# Altium PCB PCB-Thermostat.PcbDoc (part 5 of 5)
Units mm, origin at the board's own origin, x right, y up, seen from the top; angles counter-clockwise.
Board outline 100 x 90 mm, 4 copper layers (Top, PWR, GND, Bottom), stack 1.585 mm thick; 187 components, 164 nets, 696 pads, 417 vias.
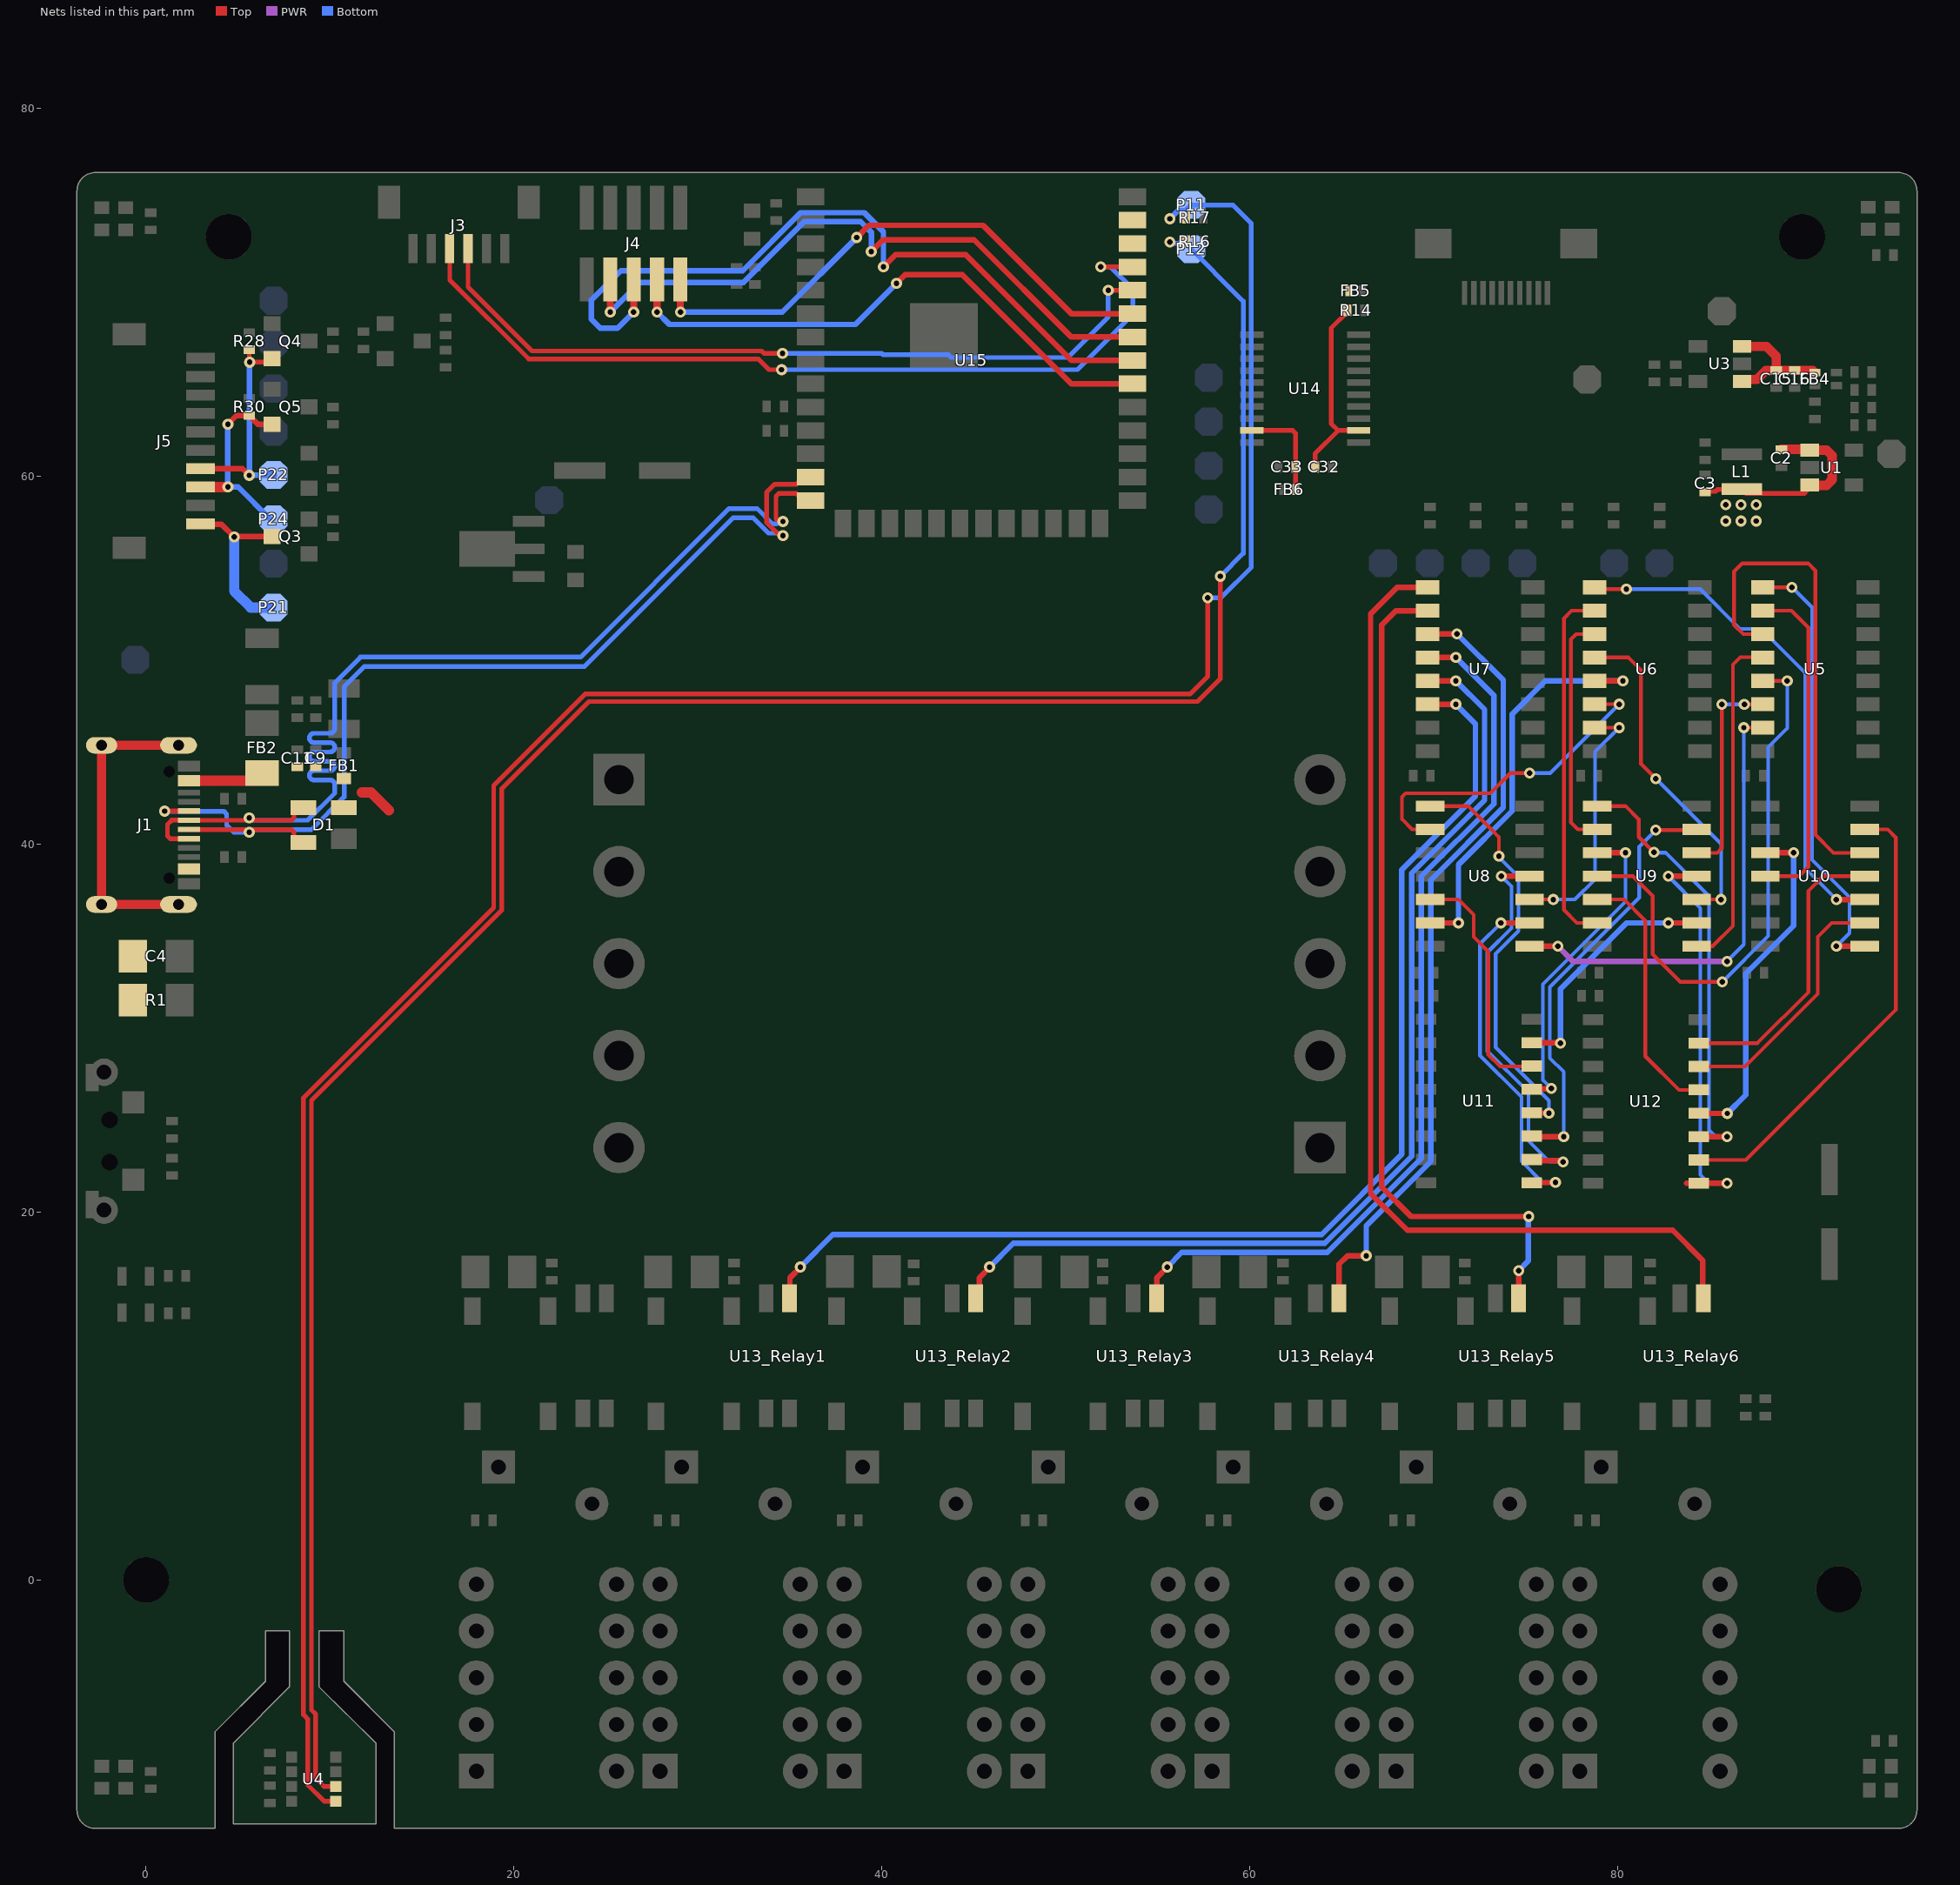
[diagram p5: the nets of this part, all layers, seen from the top]

## Via types
v1: diameter 0.6, hole 0.3, Top to Bottom, 391 vias
v2: diameter 0.8, hole 0.4, Top to Bottom, 26 vias

## Nets (pads, with @x,y where several pads share a name; then routed paths per layer and width w, separated by ;. In a path a pad name is that pad's centre, name@x,y a point inside that pad or via, vN(x,y) a via of type N, cw(c..) or ccw(c..) an arc to the next point about the centre after c; other vN are vias at no path point) (continued)
RELAY_STSN_Relay1: U7.14 U13_Relay1.3 | length 65.8
  Top w0.3: U13_Relay1.3@35,14.772 35,16.429 35.574,17.003 v1@35.584,17.014 ; U7.14@69.657,47.602 U7.14@69.654,47.604 v1(71.189,47.604)
  Bottom w0.3: v1(35.563,17.014) 37.329,18.78 63.895,18.78 68.254,23.139 68.254,38.602 72.254,42.602 72.254,46.539 v1(71.189,47.604)
RELAY_STSN_Relay2: U7.13 U13_Relay2.3 | length 57.6
  Top w0.3: U13_Relay2.3@45.287,14.772 45.287,16.429 45.861,17.003 v1@45.871,17.014 ; U7.13@69.695,48.834 U7.13@69.654,48.874 v1(71.189,48.874)
  Bottom w0.3: v1(45.85,17.014) 47.138,18.302 64.057,18.302 68.783,23.028 68.783,38.425 72.754,42.395 72.754,47.309 v1(71.189,48.874)
RELAY_STSN_Relay3: U7.12 U13_Relay3.3 | length 50
  Top w0.3: U13_Relay3.3@54.939,14.772 54.939,16.429 55.513,17.003 v1@55.523,17.014 ; U7.12@69.654,50.144 v1(71.189,50.144)
  Bottom w0.3: v1(55.502,17.014) 56.294,17.805 64.2,17.805 69.317,22.922 69.317,38.252 73.253,42.189 73.253,48.08 v1(71.189,50.144)
RELAY_STSN_Relay4: U7.11 U13_Relay4.3 | length 43.6
  Top w0.3: U13_Relay4.3@64.845,14.772 64.845,17.169 65.303,17.628 v1(66.319,17.628) ; U7.11@69.654,51.414 U7.11@69.719,51.479 ; U7.11@69.719,51.428 v1(71.254,51.428)
  Bottom w0.3: v1(66.319,17.628) 66.319,19.253 69.825,22.758 69.825,38.053 73.766,41.995 73.766,48.916 v1(71.254,51.428)
RELAY_STSN_Relay5: U7.10 U13_Relay5.3 | length 46.7
  Top w0.3: U7.10@69.654,52.684 67.929,52.684 67.158,51.912 67.158,21.356 68.754,19.759 v1@75.133,19.759 ; U13_Relay5.3@74.603,15.318 v1(74.603,16.818)
  Bottom w0.3: v1(74.603,16.818) 75.133,17.348 v1@75.133,19.757
  other v1: 75.149,19.759
RELAY_STSN_Relay6: U7.9 U13_Relay6.3 | length 56.8
  Top w0.3: U7.9@69.654,53.954 67.999,53.954 66.554,52.509 66.554,21.009 68.554,19.009 82.972,19.009 84.607,17.374 U13_Relay6.3@84.607,15.318
RLY_R0: U8.2 U11.1 | length 19.6
  Top w0.3: v1(73.641,35.719) U8.2@75.194,35.719 ; U11.1@75.319,21.564 75.358,21.602 76.593,21.602 v1(76.606,21.615)
  Bottom w0.2: v1(73.641,35.719) 72.504,34.582 72.504,28.511 74.754,26.261 74.754,22.759 75.906,21.607 76.598,21.607 v1(76.606,21.615)
RLY_R1: U9.6 U11.3 | length 22.8
  Top w0.2: v1(82.054,40.759) 83.689,40.759 U9.6@83.729,40.799
  Top w0.3: U11.3@75.319,24.104 v1(77.049,24.104)
  Bottom w0.2: v1(77.049,24.104) 77.049,27.624 76.302,28.372 76.302,32.232 81.155,37.085 81.155,39.86 v1(82.054,40.759)
RLY_R2: U9.10 U11.5 | length 18.7
  Top w0.2: U9.10@78.779,39.529 79.984,39.529
  Top w0.3: U11.5@75.32,26.644 75.371,26.695 76.352,26.695 v1(76.378,26.721) ; U9.10@78.871,39.529 v1(80.406,39.529)
  Bottom w0.2: v1(76.378,26.721) 75.924,27.175 75.924,32.388 80.406,36.871 v1(80.406,39.529)
RLY_R3: U9.2 U11.7 | length 14.3
  Top w0.2: v1@82.814,35.719 U9.2@83.729,35.719
  Top w0.3: U11.7@75.32,29.184 75.332,29.197 76.867,29.197 v1(76.879,29.184) ; v1(82.736,35.719) 82.814,35.719 U9.2@84.271,35.719
  Bottom w0.3: v1(76.879,29.184) 76.879,32.125 80.474,35.719 v1(82.736,35.719)
RLY_R4: U10.6 U12.2 | length 26
  Top w0.2: U12.2@84.396,22.834 86.943,22.834 95.098,30.988 95.098,40.361 94.659,40.799 U10.6@92.729,40.799
RLY_R5: U10.10 U12.4 | length 19
  Top w0.2: U10.10@87.779,39.529 U10.10@88.006,39.529 U10.10@88.624,39.529
  Top w0.3: U12.4@84.396,25.374 84.409,25.362 v1(85.944,25.362) ; U10.10@88.624,39.529 v1(89.541,39.529)
  Bottom w0.3: v1(85.944,25.362) 86.944,26.362 86.944,32.969 89.541,35.566 v1(89.541,39.529)
RLY_R6: U10.2 U12.6 | length 13.4
  Top w0.2: U12.6@84.396,27.914 86.909,27.914 90.854,31.859 90.854,34.959 91.614,35.719 U10.2@92.729,35.719
RLY_S0: U8.4 U11.2 | length 21.7
  Top w0.3: v1(73.659,38.259) U8.4@75.194,38.259 ; U11.2@75.319,22.834 75.363,22.79 76.955,22.79 v1(77.013,22.733)
  Bottom w0.2: v1(73.659,38.259) 74.219,37.699 74.219,35.433 72.904,34.118 72.904,28.747 75.132,26.519 75.132,23.881 76.254,22.759 76.28,22.733 v1(77.013,22.733)
RLY_S1: U8.8 U11.4 | length 22.6
  Top w0.2: U8.8@69.779,42.069 U8.8@69.794,42.069 71.844,42.069 73.01,40.903 73.533,40.38 v1(73.533,39.345)
  Top w0.3: U11.4@75.32,25.375 75.333,25.387 76.238,25.387 v1(76.251,25.375)
  Bottom w0.2: v1(73.533,39.345) 73.533,39.294 74.6,38.227 74.6,35.28 73.354,34.034 73.354,28.957 76.251,26.06 v1(76.251,25.375)
RLY_S2: U8.12 U11.6 | length 12.7
  Top w0.2: U8.12@69.779,36.989 71.324,36.989 72.154,36.159 72.154,34.959 72.954,34.159 72.954,28.559 73.599,27.914 U11.6@74.779,27.914
RLY_S3: U9.4 U12.1 | length 23.9
  Top w0.3: v1(82.736,38.259) U9.4@84.271,38.259 ; 83.729,21.564 v1(85.931,21.564) U12.1@84.396,21.564
  Bottom w0.2: v1(82.736,38.259) 84.482,36.513 84.482,22.031 84.949,21.564 v1(85.931,21.564)
RLY_S4: U9.8 U12.3 | length 24
  Top w0.2: U9.8@78.871,42.069 80.41,42.069 81.128,41.351 81.128,40.386 v1(81.954,39.559)
  Top w0.3: U12.3@84.396,24.104 v1(85.931,24.104)
  Bottom w0.2: v1(81.954,39.559) 81.975,39.538 82.585,39.538 84.954,37.169 84.954,24.459 85.309,24.104 v1(85.931,24.104)
RLY_S5: U9.12 U12.5 | length 14.1
  Top w0.2: U9.12@78.871,36.989 80.334,36.989 81.483,35.839 81.483,28.473 83.313,26.644 U12.5@84.396,26.644
RLY_S6: U10.4 U12.7 | length 15.3
  Top w0.2: U12.7@84.396,29.184 87.579,29.184 90.354,31.959 90.354,37.459 91.154,38.259 U10.4@92.729,38.259
RLYRSTN0: U5.15 U8.1 | length 25
  Top w0.2: v1@86.741,46.33 v1(86.843,46.33) U5.15@87.609,46.33
  Top w0.3: U8.1@75.194,34.449 v1(76.729,34.449)
  PWR w0.3: v1(76.729,34.449) 77.549,33.63 v1(85.928,33.63)
  Bottom w0.2: v1(85.928,33.63) 86.843,34.544 v1(86.843,46.33)
RLYRSTN1: U5.14 U9.5 | length 12
  Top w0.2: U9.5@83.729,39.529 U9.5@84.271,39.529 84.724,39.529 85.401,39.529 85.649,39.776 v1(85.649,47.6) ; v1@86.766,47.6 v1(86.868,47.6) U5.14@87.669,47.6
  Bottom w0.2: v1(85.649,47.6) v1(86.868,47.6)
RLYRSTN2: U5.13 U9.11 | length 30.2
  Top w0.2: U9.11@78.871,38.259 80.816,38.259 81.89,37.186 81.89,34.011 83.388,32.512 v1(85.674,32.512) ; U5.13@87.866,48.874 v1(89.199,48.874)
  Bottom w0.2: v1(85.674,32.512) 88.163,35.001 88.163,45.263 89.199,46.299 v1(89.199,48.874)
RLYRSTN3: U5.12 U9.1 | length 18.9
  Top w0.2: U9.1@83.729,34.449 85.144,34.449 86.254,35.559 86.254,49.759 86.654,50.159 87.739,50.159 U5.12@87.754,50.144
RLYRSTN4: U5.11 U10.5 | length 26.1
  Top w0.2: U5.11@87.754,51.414 86.813,51.414 86.309,51.918 86.309,54.814 86.754,55.259 90.334,55.259 90.726,54.867 90.726,40.516 91.713,39.529 U10.5@92.729,39.529
RLYRSTN5: U5.10 U10.11 | length 18.8
  Top w0.2: U5.10@87.754,52.684 89.429,52.684 90.348,51.765 90.348,38.76 89.846,38.259 U10.11@88.006,38.259 U10.11@87.779,38.259
RLYRSTN6: U5.9 U10.1 | length 24.4
  Top w0.2: U5.9@87.754,53.954 U5.9@87.866,53.954 89.449,53.954 v1(89.454,53.959) ; 92.406,34.467 92.424,34.449
  Top w0.3: v1(91.871,34.449) 92.424,34.449 U10.1@93.406,34.449
  Bottom w0.2: v1(89.454,53.959) 90.548,52.865 90.548,39.145 92.583,37.109 92.583,35.161 v1(91.871,34.449)
RLYSETN0: U6.15 U8.3 | length 14.1
  Top w0.2: U8.3@75.194,36.989 v1(76.486,36.989) ; U6.15@78.731,46.334 v1(80.064,46.334)
  Bottom w0.2: v1(76.486,36.989) 77.654,36.989 78.754,38.089 78.754,45.024 v1(80.064,46.334)
RLYSETN1: U6.14 U8.9 | length 18.3
  Top w0.2: U8.9@69.779,40.799 68.814,40.799 68.254,41.359 68.254,42.559 68.454,42.759 73.054,42.759 74.154,43.859 v1(75.191,43.859) ; U6.14@78.731,47.604 U6.14@78.754,47.604 ; U6.14@78.799,47.559 U6.14@78.754,47.604 ; v1(80.064,47.604) U6.14@78.754,47.604
  Bottom w0.2: v1(75.191,43.859) 76.319,43.859 v1(80.064,47.604)
RLYSETN2: U6.13 U8.13 | length 22.4
  Top w0.2: U8.13@69.779,35.719 U8.13@69.794,35.719
  Top w0.3: U8.13@69.794,35.719 v1(71.329,35.719) ; U6.13@78.731,48.874 v1(80.266,48.874)
  Bottom w0.3: v1(71.329,35.719) 71.329,38.882 74.244,41.797 74.244,47.066 76.052,48.874 v1(80.266,48.874)
RLYSETN3: U6.12 U9.3 | length 19.6
  Top w0.2: U6.12@78.754,50.144 80.569,50.144 81.254,49.459 81.254,44.359 v1(82.054,43.559) ; U9.3@83.729,36.989 U9.3@84.746,36.989 ; U9.3@84.271,36.989 U9.3@84.746,36.989 ; v1(85.604,36.989) U9.3@84.746,36.989
  Bottom w0.2: v1@81.894,43.719 85.604,40.009 v1(85.604,36.989)
RLYSETN4: U6.11 U9.9 | length 12.9
  Top w0.2: U6.11@78.731,51.414 77.728,51.414 77.441,51.127 77.441,41.177 77.819,40.799 U9.9@78.779,40.799
RLYSETN5: U6.10 U9.13 | length 19.7
  Top w0.2: U6.10@78.754,52.684 77.479,52.684 77.064,52.268 77.064,36.424 77.768,35.719 U9.13@78.779,35.719
RLYSETN6: U6.9 U10.3 | length 27.9
  Top w0.2: U6.9@78.754,53.954 78.849,53.859 v1(80.454,53.859)
  Top w0.3: v1(91.871,36.989) U10.3@93.406,36.989
  Bottom w0.2: v1(80.454,53.859) 84.47,53.859 86.634,51.694 87.777,51.694 90.17,49.301 90.17,38.69 v1(91.871,36.989)
RSTKEY: J5.10 P21.1 Q3.3 | length 9.5
  Top w0.305: J5.10@2.982,57.388 4.1,57.388 v1(4.796,56.693) ; v1@4.832,56.718 Q3.3@6.865,56.718
  Top w0.559: J5.10@2.961,57.409 J5.10@2.982,57.388 ; v1(4.796,56.693) 4.807,56.693 v1@4.832,56.718
  Bottom w0.559: v1@4.796,56.674 4.796,53.751 5.69,52.857 P21.1@6.782,52.857
RX_1V8: J5.7 P22.1 Q4.2 R28.1 | length 12.2
  Top w0.254: R28.1@5.613,66.876 5.613,66.192 6.661,66.192 Q4.2@6.865,66.396
  Top w0.305: J5.7@2.965,60.405 5.243,60.405 v1@5.602,60.046
  Top w0.559: J5.7@2.961,60.409 J5.7@2.965,60.405 ; v1@5.602,60.046 v1(5.613,60.046)
  Bottom w0.305: v1(5.613,60.046) 5.624,60.056 5.624,66.182 v1(5.634,66.192) ; v1@5.621,60.053 P22.1@6.84,60.053
  Bottom w0.559: v1(5.613,60.046) v1@5.621,60.053 ; P22.1@6.84,60.053 P22.1@6.858,60.071
RXD: J3.4 U15.36 | length 42
  Top w0.254: J3.4@17.505,72.191 17.505,70.277 20.979,66.802 33.454,66.802 33.581,66.675 v1(34.595,66.675) ; v1(52.299,70.104) U15.36@53.619,70.104
  Bottom w0.254: v1(34.595,66.675) 39.979,66.675 40.055,66.599 43.608,66.599 43.756,66.451 50.094,66.451 52.299,68.656 v1(52.299,70.104)
SCL: P11.1 R17.1 U4.4 U15.39 | length 133
  Top w0.254: U4.4@10.319,-12.02 9.684,-12.02 8.788,-11.125 8.788,-7.544 8.56,-7.315 8.56,26.216 18.898,36.554 18.898,43.189 23.867,48.158 56.744,48.158 57.709,49.124 v1(57.709,53.391)
  Bottom w0.254: P11.1@56.807,74.741 59.066,74.741 60.071,73.736 60.071,55.042 58.42,53.391 v1(57.709,53.391)
  Bottom w0.305: v1(55.651,73.99) 56.084,74.423 56.489,74.423 P11.1@56.807,74.741
SDA: P12.1 R16.1 U4.3 U15.38 | length 127.4
  Top w0.254: U4.3@10.319,-11.22 9.671,-11.22 9.22,-10.77 9.22,-7.29 8.992,-7.061 8.992,26.073 19.329,36.411 19.329,43.002 24.079,47.752 57.15,47.752 58.395,48.997 v1(58.395,54.559)
  Bottom w0.254: v1@55.626,72.72 55.689,72.657 56.49,72.657 59.639,69.507 59.639,55.804 v1(58.395,54.559)
  other v1: 55.651,72.72
SH: C4.1 J1.S1 J1.S2 J1.S3 J1.S4 R1.2 | length 17
  Top w0.5: J1.S1@1.77,36.721 J1.S2@-2.41,36.721 J1.S3@-2.41,45.371 J1.S4@1.77,45.371
TCK: J4.4 U15.32 | length 31.5
  Top w0.305: v1(40.792,70.485) 41.25,70.942 44.374,70.942 50.292,65.024 U15.32@53.619,65.024
  Top w0.381: v1(27.776,68.922) J4.4@27.776,70.694
  Bottom w0.305: v1(27.776,68.922) 28.453,68.245 38.552,68.245 v1(40.792,70.485)
TDI: J4.8 U15.34 | length 36
  Top w0.305: v1(39.421,72.212) 39.425,72.212 40.06,72.847 45.009,72.847 50.292,67.564 U15.34@53.619,67.564
  Top w0.381: v1(25.236,68.922) J4.8@25.236,70.694 ; U15.34@53.594,67.64 U15.34@53.619,67.666
  Bottom w0.305: v1(25.236,68.922) 26.85,70.536 32.474,70.536 35.776,73.838 38.839,73.838 39.421,73.256 v1(39.421,72.212)
TDO: J4.6 U15.33 | length 42
  Top w0.305: v1(40.081,71.374) 40.742,72.034 44.552,72.034 50.292,66.294 U15.33@53.619,66.294
  Top w0.381: v1(26.506,68.922) J4.6@26.506,70.694
  Bottom w0.305: v1(26.506,68.922) 25.631,68.047 24.689,68.047 24.206,68.529 24.206,69.571 25.806,71.171 32.426,71.171 35.576,74.32 39.04,74.32 40.081,73.279 v1(40.081,71.374)
TMS: J4.2 U15.35 | length 30.3
  Top w0.305: v1(38.633,72.974) 39.294,73.635 45.491,73.635 50.292,68.834 U15.35@53.619,68.834
  Top w0.381: v1(29.046,68.922) J4.2@29.046,70.694 ; U15.35@53.619,68.936 U15.35@53.645,68.91
  Bottom w0.305: v1(29.046,68.922) 34.581,68.922 v1(38.633,72.974)
TX_1V8: J5.8 P24.1 Q5.2 R30.1 | length 10.6
  Top w0.305: v1(4.451,62.819) 4.921,63.289 5.702,63.289 5.779,63.213 5.779,63.124 6.083,62.819 Q5.2@6.865,62.819
  Top w0.559: J5.8@2.961,59.409 2.962,59.41 4.292,59.41 v1@4.293,59.411
  Bottom w0.305: v1(4.451,62.819) v1(4.451,59.411) 5.004,59.411 P24.1@6.756,57.658
TXD: J3.3 U15.37 | length 47.3
  Top w0.254: J3.3@16.512,72.191 16.512,70.659 20.8,66.37 33.275,66.37 33.859,65.786 v1(34.544,65.786) ; v1(51.892,71.374) U15.37@53.619,71.374
  Bottom w0.254: v1(34.544,65.786) 50.622,65.786 53.645,68.809 53.645,70.155 52.426,71.374 v1(51.892,71.374)
USB_N: D1.4 J1.A7 J1.B7 U15.13 | length 58.2
  Top w0.254: v1@1.015,41.808 2.328,41.808 J1.B7@2.34,41.796 ; J1.A7@2.348,40.788 v1@5.385,40.788 ; v1@5.842,40.788 7.9,40.788 8.051,40.637 8.051,40.359 8.324,40.086 D1.4@8.56,40.086 ; v1@34.381,56.827 33.731,57.477 33.731,59.117 34.178,59.563 35.348,59.563 35.406,59.621 35.796,59.621 U15.13@36.119,59.944
  Bottom w0.254: v1@1.015,41.783 4.235,41.783 4.384,41.634 4.384,41.031 4.762,40.653 v1(5.613,40.653) 5.707,40.653 5.842,40.788 8.994,40.788 10.77,42.563 10.77,47.581 10.77,48.558 11.869,49.657 23.832,49.657 31.906,57.731 33.003,57.731 33.837,56.896 34.391,56.896 34.526,56.761 v1(34.62,56.761)
  other v1: 1.015,41.794
USB_P: D1.3 J1.A6 J1.B6 U15.14 | length 59.7
  Top w0.254: J1.B6@2.34,40.296 1.317,40.296 1.168,40.445 1.168,41.072 1.396,41.3 J1.A6@2.34,41.3 ; J1.A6@2.34,41.296 v1@5.385,41.296 ; v1@5.842,41.296 7.896,41.296 8.045,41.445 8.045,41.713 8.318,41.986 D1.3@8.56,41.986 ; 34.322,57.605 34.239,57.688 34.239,58.906 34.388,59.055 35.348,59.055 35.406,58.997 35.796,58.997 U15.14@36.119,58.674
  Bottom w0.254: v1(5.613,41.431) 5.707,41.431 5.842,41.296 8.784,41.296 10.262,42.774 10.262,43.104 10.262,43.231 ccw(c10.008,43.231) 10.008,43.485 9.133,43.485 cw(c9.133,43.739) 9.133,43.993 10.008,43.993 ccw(c10.008,44.247) 10.008,44.501 9.133,44.501 cw(c9.133,44.755) 9.133,45.009 10.008,45.009 ccw(c10.008,45.263) 10.008,45.517 9.133,45.517 cw(c9.133,45.771) 9.133,46.025 10.008,46.025 ccw(c10.008,46.279) 10.262,46.279 10.262,47.581 10.262,48.768 11.659,50.165 23.622,50.165 31.696,58.239 33.213,58.239 34.048,57.404 34.258,57.404 34.327,57.473 34.553,57.473 v1(34.62,57.539)
VBUS: C9.1 C11.1 D1.2 FB1.1 FB2.1 J1.A4/B9 J1.B4/A9 | length 6.4
  Top w0.254: J1.B4/A9@2.215,38.771 J1.B4/A9@2.34,38.646 ; J1.A4/B9@2.215,43.321 J1.A4/B9@2.34,43.446
  Top w0.559: J1.A4/B9@2.34,43.446 5.904,43.446 FB2.1@6.322,43.863 ; 11.735,42.807 12.235,42.807 13.208,41.834
VCCA: C32.2 FB5.2 R14.2 U14.2 | length 10.6
  Top w0.254: C32.2@63.536,60.512 63.536,61.225 64.795,62.484 ; R14.2@65.286,69.006 65.286,68.917 64.414,68.045 64.414,62.865 64.795,62.484 ; U14.2@65.903,62.484 64.795,62.484
VCCB: C33.1 FB6.1 U14.19 | length 5.5
  Top w0.254: U14.19@60.103,62.484 62.324,62.484 62.473,62.335 C33.1@62.473,60.512 62.477,60.508 62.477,59.273 FB6.1@62.481,59.269
VIN_3V3: C2.1 C3.2 L1.2 U1.1 U1.3 | length 11.8
  Top w0.254: C3.2@84.627,59.182 85.319,59.182 85.404,59.267 86.712,59.267 L1.2@86.736,59.292 86.973,59.055 90.117,59.055 90.227,59.165 90.227,59.292 U1.3@90.421,59.487
  Top w0.508: C2.1@88.875,61.455 90.381,61.455 U1.1@90.421,61.415 91.346,61.415 91.643,61.118 91.643,59.8 91.346,59.503 90.437,59.503 U1.3@90.421,59.487
  other v1: 85.852,57.556 86.684,57.556 87.516,57.556 85.852,58.445 86.684,58.445 87.516,58.445
VIN_3V3C: C15.1 C16.2 FB4.2 U3.1 U3.3 | length 7.1
  Top w0.508: U3.1@86.744,65.153 86.84,65.249 87.551,65.249 88.049,65.748 C15.1@88.595,65.748 ; U3.3@86.744,67.053 88.064,67.053 88.595,66.523 C15.1@88.595,65.748 ; FB4.2@90.703,65.628 90.703,65.636 90.592,65.748 C16.2@89.606,65.748 C15.1@88.595,65.748
pads on no net: J1.A8 J1.B8 J1.MH J4.7 LED6.2 SW1.3 SW1.4 SW1.5 SW1.6 SW1.MH0 SW1.MH1 U1.4 U3.4 U5.7 U6.7 U7.7 U8.5 U8.6 U8.10 U8.11 U10.8 U10.9 U10.12 U10.13 U15.8 U15.15 U15.16 U15.18 U15.26

## Polygon pours and split planes (outlines as drawn)
GND on Top "GND_L01_P003" (solid, remove dead copper, pour order 3): -3.226,-10.24 ccw(c-0.722,-10.761) -1.902,-13.03 3.124,-13.03 3.124,-7.798 5.893,-5.029 5.893,-2.134 7.8,-2.134 9.4,-2.134 11.455,-2.134 11.455,-5.156 14.11,-7.811 14.11,-13.03 91.575,-13.03 ccw(c92.804,-9.767) 95.829,-11.5 95.839,74.646 ccw(c94.313,74.481) 94.313,76.016 -2.531,76.016 ccw(c-2.427,75.208) -3.226,75.366
+3V3 on Top "+3V3_L01_P004" (solid, pour order 4): 19.998,63.5 25.603,63.5 25.603,57.252 19.998,57.252
GND on Top "GND_L01_P005" (solid, pour order 5): 25.603,63.525 30.201,63.525 30.201,57.252 30.02,57.252 25.606,57.252 25.603,57.248
VBUS on Top "VBUS_L01_P000" (solid, pour order 0): 2.106,43.739 0.896,43.739 -0.254,42.589 -0.254,39.714 1.006,38.454 2.106,38.454
GND on Bottom "GND_L04_P007" (solid, remove dead copper, pour order 7): -3.22,-10.231 ccw(c-0.715,-10.752) -1.896,-13.021 3.13,-13.021 3.13,-7.789 5.899,-5.02 5.899,-2.125 7.806,-2.125 9.406,-2.125 11.462,-2.125 11.462,-5.147 14.116,-7.802 14.116,-13.021 91.581,-13.021 ccw(c92.81,-9.758) 95.836,-11.491 95.845,74.655 ccw(c94.319,74.49) 94.319,76.024 -2.525,76.024 ccw(c-2.421,75.217) -3.22,75.375
+3V3 on Bottom "+3V3_L04_P009" (solid, pour order 9): 19.812,63.5 25.146,63.5 25.146,57.252 19.812,57.252
+3V3 on Bottom "+3V3_L04_P010" (solid, pour order 10): 20.32,63.5 25.146,63.5 25.146,57.252 20.32,57.252
+3V3 on PWR "+3V3_L02_P008" (solid, remove dead copper, pour order 8): -3.226,-10.24 ccw(c-0.722,-10.761) -1.902,-13.03 3.124,-13.03 3.124,-7.798 5.893,-5.029 5.893,-2.134 7.8,-2.134 9.4,-2.134 11.455,-2.134 11.455,-5.156 14.11,-7.811 14.11,-13.03 91.575,-13.03 ccw(c92.804,-9.767) 95.829,-11.5 95.839,74.646 ccw(c94.313,74.481) 94.313,76.016 -2.531,76.016 ccw(c-2.427,75.208) -3.226,75.366
+5V on PWR "+5V_L02_P011" (solid, pour order 11): 12.852,60.147 12.878,60.147 18.898,60.147 18.898,51.638 18.771,51.638 12.751,51.638 12.751,60.147
GND on GND "GND_L03_P006" (solid, remove dead copper, pour order 6): -3.226,-10.24 ccw(c-0.722,-10.761) -1.902,-13.03 3.124,-13.03 3.124,-7.798 5.893,-5.029 5.893,-2.134 7.8,-2.134 9.4,-2.134 11.455,-2.134 11.455,-5.156 14.11,-7.811 14.11,-13.03 91.575,-13.03 ccw(c92.804,-9.767) 95.829,-11.5 95.839,74.646 ccw(c94.313,74.481) 94.313,76.016 -2.531,76.016 ccw(c-2.427,75.208) -3.226,75.366

## Keep-outs
Top:
  region: 9.4,-5.814 12.5,-8.89 12.5,-13.25 4.75,-13.25 4.75,-8.875 7.8,-5.807 7.8,-2.75 9.4,-2.75
  region: 69.955,20.549 86.955,20.549 86.955,-13.267 16.129,-13.275 16.129,17.912 20.277,22.186 20.277,43.34 23.571,46.634 69.955,46.634
PWR:
  region: 9.4,-5.814 12.5,-8.89 12.5,-13.25 4.75,-13.25 4.75,-8.875 7.8,-5.807 7.8,-2.75 9.4,-2.75
  region: 69.955,20.549 86.955,20.549 86.955,-13.267 16.129,-13.275 16.129,17.912 20.277,22.186 20.277,43.34 23.571,46.634 69.955,46.634
GND:
  region: 9.4,-5.814 12.5,-8.89 12.5,-13.25 4.75,-13.25 4.75,-8.875 7.8,-5.807 7.8,-2.75 9.4,-2.75
  region: 69.955,20.549 86.955,20.549 86.955,-13.267 16.129,-13.275 16.129,17.912 20.277,22.186 20.277,43.34 23.571,46.634 69.955,46.634
Bottom:
  region: 9.4,-5.814 12.5,-8.89 12.5,-13.25 4.75,-13.25 4.75,-8.875 7.8,-5.807 7.8,-2.75 9.4,-2.75
  region: 69.955,20.549 86.955,20.549 86.955,-13.267 16.129,-13.275 16.129,17.912 20.277,22.186 20.277,43.34 23.571,46.634 69.955,46.634

## Other copper
Top:
  rectangle net +3V3: 21.344,59.639 25.451,63.118
  rectangle net GND: 19.812,51.816 24.003,54.839
  rectangle net VIN_3V3: 84.369,58.445 88.265,59.66
  rectangle net VIN_3V3: 84.379,57.277 90.957,59.292
  rectangle net +5V: 83.21,61.366 85.961,62.332
  rectangle net +5V: 85.471,60.757 87.935,62.332
  rectangle net GND: 67.894,71.653 71.069,73.558
  rectangle net GND: 68.656,69.113 72.314,70.663
  rectangle net VCCA: 64.999,68.631 65.659,70.46
  rectangle net +5V: 94.463,-10.566 95.352,-7.366
  rectangle net GPIO5: 81.824,56.363 82.688,57.633
  rectangle net GPIO4: 79.324,56.363 80.188,57.633
  rectangle net E3: 76.824,56.159 77.688,57.633
  rectangle net GPIO9: 74.324,56.134 75.188,57.633
  rectangle net GPIO8: 71.824,56.185 72.688,57.633
  rectangle net +5V: 15.9,65.481 17.348,66.345
  rectangle net SH: -3.2,30.505 0.178,36.83
  rectangle net +1V8: 4.496,67.564 7.341,68.885
  rectangle net GND: 2.134,66.319 3.81,67.462
  rectangle net +5V: 12.545,47.727 18.923,63.424
  rectangle net +3V3: 30.048,72.06 33.528,73.584
  rectangle net SCL: 52.832,73.508 56.807,74.498
  rectangle net SDA: 52.832,72.238 56.794,73.228
  rectangle net GPIO7: 69.342,56.134 70.206,57.633
  rectangle net +5V: 94.488,70.434 95.356,73.821
  rectangle net VBUS: 5.283,43.053 9.957,44.628
  rectangle net GND: 60.706,60.096 61.824,60.96
  rectangle net VBUS: 9.982,41.554 13.487,44.059
  rectangle net NetC8_1: 10.299,44.491 11.709,45.872
  rectangle net VBUS: 9.525,43.053 11.709,44.059
  rectangle net GND: -1.854,55.524 0.025,68.326
  rectangle net +5V: -1.575,72.212 0.663,73.787
  rectangle net +5V: -1.499,-11.963 0.663,-10.871
  rectangle net GND: 4.953,42.113 6.375,42.875
  region net GND: -2.311,17.278 -2.311,14.046 -0.61,14.046 -0.61,17.278
  rectangle net NetLED1_1: -0.127,13.919 1.506,15.138
  rectangle net NetLED2_1: -0.127,15.9 1.506,17.12
  rectangle net 3V3_C: 92.116,60.554 95.809,62.027
  rectangle net 1V8_SENSOR: 77.784,64.759 84.912,65.507
  rectangle net 5V_TABLET: 0.711,60.935 3.886,62.789
  rectangle net GND: 7.874,47.574 9.576,48.793
  rectangle net NetC10_1: 5.283,46.583 7.391,48.793
  rectangle net NetC10_1: 5.283,45.745 8.56,47.295
  region net NetC8_1: 11.709,47.295 8.823,47.295 8.823,45.745 11.709,45.745
  rectangle net GND: 0.762,30.48 2.87,35.077
  rectangle net +5V: 16.891,55.054 23.927,57.036
  rectangle net NetR19_1: 34.392,62.027 36.881,62.941
  rectangle net NetR18_1: 34.392,63.297 36.855,64.211
  region net GND: 93.04,24.336 93.04,20.297 89.977,20.297 89.977,24.336
  region net +3V3: 93.04,19.736 93.04,15.697 89.977,15.697 89.977,19.736
  region net +5V: 60.63,57.556 62.408,57.556 62.408,55.702 60.63,55.702
  region net +3V3: 36.83,74.359 34.18,74.359 32.283,72.661 32.283,72.085 32.309,72.06 34.061,72.06 35.56,73.558
  region net GND: 5.918,38.125 5.918,37.363 5.918,34.671 3.226,34.671 3.226,38.125
  region net GND: 4.445,48.006 4.369,47.93 4.369,44.755 3.505,44.755 3.505,46.33 2.642,46.33 2.642,48.006
Bottom:
  rectangle net +5V: 12.634,50.459 18.923,62.581
  rectangle net +3V3: 21.158,61.544 25.222,63.449
  rectangle net GND: 19.914,51.816 24.003,54.635
  rectangle net VIN_3V3: 85.344,57.048 88.036,58.903
  region net ESP_TXD: 8.407,68.097 8.407,66.37 6.198,66.37 6.172,66.396 6.172,68.097
  region net +5V: 60.63,57.556 62.408,57.556 62.408,55.702 60.63,55.702

## Silkscreen, mask and mechanical layers (free items; w line width, h text height)
Top Overlay:
  lines w0.254: 8.23,43.81 8.23,43.282 8.484,43.028 11.659,43.028 11.887,42.799 ; 9.711,45.263 9.957,45.263 10.211,45.517 11.836,45.517 ; 88.214,62.865 88.671,62.408 90.246,62.408 91.338,62.408 92.329,63.398
  text "JLCJLCJLCJLC" at 39.878,75.228 h1.52
  text "%" at 33.796,75.174 h0.64
  text "RADAR" at 68.732,74.755 h1.78
  text "%" at -0.226,74.576 h0.64
  text "%" at 93.689,71.526 h0.64 r90
  text "3V3_SENSOR" at 80.005,69.952 h1.52
  text "%" at 82.649,66.383 h0.64
  text "%" at 94.132,66.167 h0.64 r270
  text "%" at 87.96,66.091 h0.76
  text "%" at 94.132,65.176 h0.64 r270
  text "%" at 91.135,64.389 h0.64 r270
  text "1V8_SENSOR" at 72.09,62.645 h1.52
  text "%" at 95.072,62.255 h0.64 r90
  text "%" at 64.846,60.985 h0.64 r270
  text "%" at 89.357,60.198 h0.64 r180
  text "%" at 61.189,60.026 h0.64 r90
  text "3V3_C" at 95.688,55.778 h1.52 r90
  text "TABLET" at -1.88,55.474 h1.78 r90
  text "%" at 7.747,48.128 h0.64
  text "%" at 8.747,48.128 h0.64
  text "%" at 85.674,44.221 h0.64 r270
  text "%" at 67.666,44.196 h0.64 r270
  text "%" at 76.683,44.196 h0.64 r270
  text "%" at 76.784,33.503 h0.64 r270
  text "%" at 67.818,33.477 h0.64 r270
  text "%" at 85.75,33.477 h0.64 r270
  text "Thermostat" at 7.163,32.658 h2.03
  text "%" at 67.869,32.233 h0.64 r270
  text "%" at 76.784,32.233 h0.64 r270
  text "revB" at 11.784,31.21 h2.03
  text "%" at 1.854,24.689 h0.64
  text "#" at 17.031,17.818 h1.14
  text "#" at 26.962,17.818 h1.14
  text "#" at 36.881,17.818 h1.14
  text "#" at 47.053,17.818 h1.14
  text "#" at 56.756,17.818 h1.14
  text "#" at 66.688,17.818 h1.14
  text "#" at 76.594,17.818 h1.14
  text "$" at 21.609,17.551 h1.14
  text "$" at 31.515,17.551 h1.14
  text "$" at 51.556,17.551 h1.14
  text "$" at 61.36,17.551 h1.14
  text "$" at 71.241,17.551 h1.14
  text "$" at 81.299,17.551 h1.14
  text "$" at 41.269,17.501 h1.14
  text "*" at 23.571,15.912 h1.14
  text "*" at 33.528,15.912 h1.14
  text "*" at 43.813,15.912 h1.14
  text "*" at 53.467,15.912 h1.14
  text "*" at 63.373,15.912 h1.14
  text "*" at 73.152,15.912 h1.14
  text "*" at 83.185,15.912 h1.14
  text "&" at 75.955,12.446 h1.14
  text "&" at 16.24,12.421 h1.14
  text "&" at 26.222,12.421 h1.14
  text "&" at 36.027,12.421 h1.14
  text "&" at 46.161,12.421 h1.14
  text "&" at 56.143,12.421 h1.14
  text "&" at 66.049,12.395 h1.14
  text "@" at 17.602,3.876 h1.02
  text "@" at 27.534,3.876 h1.02
  text "@" at 47.549,3.876 h1.02
  text "@" at 67.488,3.876 h1.02
  text "@" at 37.465,3.85 h1.02
  text "@" at 57.48,3.85 h1.02
  text "@" at 77.495,3.698 h1.02
  text "%" at 6.248,-9.068 h0.64
  text "%" at 93.689,-9.224 h0.64 r90
  text "%" at -0.226,-10.086 h0.64
  text "%" at 7.214,-12.319 h0.64 r180
Bottom Overlay:
  text "SCL" at 55.884,74.057 h1.52
  text "SDA" at 55.883,71.66 h1.52
  text "1V8" at 5.929,68.859 h1.52
  text "ESP_TXD" at 5.928,66.345 h1.52
  text "CS" at 56.771,64.592 h1.52
  text "ESP_RXD" at 5.979,63.906 h1.52
  text "SCLK" at 56.772,62.272 h1.52
  text "RGB_DATA" at 5.954,61.595 h1.52
  text "MISO" at 56.772,59.885 h1.52
  text "RX_1V8" at 5.954,59.246 h1.52
  text "3V3" at 20.936,58.014 h1.52
  text "MOSI" at 56.796,57.497 h1.52
  text "TX_1V8" at 5.98,56.845 h1.52
  text "RLYADDR0" at 69.068,56.269 h1.52 r270
  text "RLYADDR1" at 71.558,56.282 h1.52 r270
  text "RLYADDR2" at 74.123,56.269 h1.52 r270
  text "RLYSTS" at 66.513,56.233 h1.52 r270
  text "RLYSET" at 79.075,56.235 h1.52 r270
  text "RLYRST" at 81.571,56.234 h1.52 r270
  text "PWRKEY" at 5.978,54.559 h1.52
  text "RSTKEY" at 5.953,52.121 h1.52
  text "5V_TABLET" at 8.52,49.174 h1.52
  text "Note:" at 15.926,12.649 h1.78
  text "$>> R13_Relay0,R13_Relay6" at 16.053,10.819 h1.52
  text "@>> R12_Relay0,R12_Relay6" at 16.053,9.075 h1.52
  text "&>> BR1_Relay0,BR1_Relay6" at 16.053,7.323 h1.52
  text "#>> C31_Relay0,C31_Relay6" at 16.053,5.734 h1.52
  text "*>> U13_Relay0,U13_Relay6" at 16.053,4.135 h1.52
  text "%>> 100nF 0402" at 16.053,2.132 h1.52
Dimension:
  circle w0.013: c0,0 r1.25
  circle w0.013: c17.94,-0.17 r0.4
  circle w0.013: c17.94,-2.71 r0.4
  circle w0.013: c17.94,-5.25 r0.4
  circle w0.013: c17.94,-7.79 r0.4
  circle w0.013: c17.94,-10.33 r0.4
  circle w0.013: c25.56,-0.17 r0.4
  circle w0.013: c25.56,-2.71 r0.4
  circle w0.013: c25.56,-5.25 r0.4
  circle w0.013: c27.94,-0.17 r0.4
  circle w0.013: c27.94,-2.71 r0.4
  circle w0.013: c27.94,-5.25 r0.4
  circle w0.013: c25.56,-7.79 r0.4
  circle w0.013: c25.56,-10.33 r0.4
  circle w0.013: c27.94,-7.79 r0.4
  circle w0.013: c27.94,-10.33 r0.4
  circle w0.013: c35.56,-0.17 r0.4
  circle w0.013: c35.56,-2.71 r0.4
  circle w0.013: c37.94,-0.17 r0.4
  circle w0.013: c37.94,-2.71 r0.4
  circle w0.013: c35.56,-5.25 r0.4
  circle w0.013: c37.94,-5.25 r0.4
  circle w0.013: c35.56,-7.79 r0.4
  circle w0.013: c37.94,-7.79 r0.4
  circle w0.013: c35.56,-10.33 r0.4
  circle w0.013: c37.94,-10.33 r0.4
  circle w0.013: c45.56,-0.17 r0.4
  circle w0.013: c47.94,-0.17 r0.4
  circle w0.013: c45.56,-2.71 r0.4
  circle w0.013: c47.94,-2.71 r0.4
  circle w0.013: c45.56,-5.25 r0.4
  circle w0.013: c47.94,-5.25 r0.4
  circle w0.013: c55.56,-0.17 r0.4
  circle w0.013: c55.56,-2.71 r0.4
  circle w0.013: c55.56,-5.25 r0.4
  circle w0.013: c45.56,-7.79 r0.4
  circle w0.013: c47.94,-7.79 r0.4
  circle w0.013: c45.56,-10.33 r0.4
  circle w0.013: c47.94,-10.33 r0.4
  circle w0.013: c55.56,-7.79 r0.4
  circle w0.013: c55.56,-10.33 r0.4
  circle w0.013: c57.94,-0.17 r0.4
  circle w0.013: c57.94,-2.71 r0.4
  circle w0.013: c57.94,-5.25 r0.4
  circle w0.013: c65.56,-0.17 r0.4
  circle w0.013: c65.56,-2.71 r0.4
  circle w0.013: c67.94,-0.17 r0.4
  circle w0.013: c67.94,-2.71 r0.4
  circle w0.013: c65.56,-5.25 r0.4
  circle w0.013: c67.94,-5.25 r0.4
  circle w0.013: c57.94,-7.79 r0.4
  circle w0.013: c57.94,-10.33 r0.4
  circle w0.013: c65.56,-7.79 r0.4
  circle w0.013: c67.94,-7.79 r0.4
  circle w0.013: c65.56,-10.33 r0.4
  circle w0.013: c67.94,-10.33 r0.4
  circle w0.013: c75.56,-0.17 r0.4
  circle w0.013: c77.94,-0.17 r0.4
  circle w0.013: c75.56,-2.71 r0.4
  circle w0.013: c77.94,-2.71 r0.4
  circle w0.013: c75.56,-5.25 r0.4
  circle w0.013: c77.94,-5.25 r0.4
  circle w0.013: c75.56,-7.79 r0.4
  circle w0.013: c77.94,-7.79 r0.4
  circle w0.013: c75.56,-10.33 r0.4
  circle w0.013: c77.94,-10.33 r0.4
  circle w0.013: c85.56,-0.17 r0.4
  circle w0.013: c85.56,-2.71 r0.4
  circle w0.013: c85.56,-5.25 r0.4
  circle w0.013: c92,-0.5 r1.25
  circle w0.013: c85.56,-7.79 r0.4
  circle w0.013: c85.56,-10.33 r0.4
  lines w0.254: 15.519,-13.564 15.519,38.125 15.519,-13.564
Board Outline:
  lines w0.254: 56.871,76.505 56.883,76.492 ; -3.75,-12.5 ccw(c-2.75,-12.5) -2.75,-13.5 3.75,-13.5 3.75,-8.25 6.5,-5.5 6.5,-2.75 7.8,-2.75 7.8,-5.8 4.75,-8.875 4.75,-13.25 12.5,-13.25 12.5,-8.875 9.4,-5.8 9.4,-2.75 10.75,-2.75 10.75,-5.5 13.5,-8.25 13.5,-13.5 95.25,-13.5 ccw(c95.25,-12.5) 96.25,-12.5 96.25,75.5 ccw(c95.25,75.5) 95.25,76.5 -2.75,76.5 ccw(c-2.75,75.5) -3.75,75.5 -3.75,-12.5
Fabrication:
  drawing of 511 lines, arcs and shapes, not listed
  text "Layer" at 115.893,75.221 h1.52
  text "Name" at 126.305,75.221 h1.52
  text "Material" at 149.921,75.221 h1.52
  text "Thickness" at 171.759,75.221 h1.52
  text "Constant" at 188.265,75.221 h1.52
  text "Board Layer Stack" at 202.739,75.221 h1.52
  text "Top Overlay" at 126.305,72.173 h1.52
  text "Top Solder" at 126.305,69.125 h1.52
  text "Solder Resist" at 149.921,69.125 h1.52
  text "0.39mil" at 171.759,69.125 h1.52
  text "3.5" at 188.265,69.125 h1.52
  text "1" at 115.893,66.077 h1.52
  text "Top" at 126.305,66.077 h1.52
  text "1.38mil" at 171.759,66.077 h1.52
  text "Dielectric 4" at 126.305,63.029 h1.52
  text "PP-006" at 149.921,63.029 h1.52
  text "8.26mil" at 171.759,63.029 h1.52
  text "4.1" at 188.265,63.029 h1.52
  text "2" at 115.893,59.981 h1.52
  text "PWR" at 126.305,59.981 h1.52
  text "CF-004" at 149.921,59.981 h1.52
  text "0.60mil" at 171.759,59.981 h1.52
  text "Dielectric 1" at 126.305,56.933 h1.52
  text "FR-4" at 149.921,56.933 h1.52
  text "41.93mil" at 171.759,56.933 h1.52
  text "4.8" at 188.265,56.933 h1.52
  text "3" at 115.893,53.885 h1.52
  text "GND" at 126.305,53.885 h1.52
  text "CF-004" at 149.921,53.885 h1.52
  text "0.60mil" at 171.759,53.885 h1.52
  text "Dielectric 5" at 126.305,50.837 h1.52
  text "PP-006" at 149.921,50.837 h1.52
  text "8.26mil" at 171.759,50.837 h1.52
  text "4.1" at 188.265,50.837 h1.52
  text "4" at 115.893,47.789 h1.52
  text "Bottom" at 126.305,47.789 h1.52
  text "1.38mil" at 171.759,47.789 h1.52
  text "Bottom Solder" at 126.305,44.741 h1.52
  text "Solder Resist" at 149.921,44.741 h1.52
  text "0.39mil" at 171.759,44.741 h1.52
  text "3.5" at 188.265,44.741 h1.52
  text "Bottom Overlay" at 126.305,41.693 h1.52
  text "4-Layer Stackup 1.6mm FR4" at 26.289,-17.049 h3.81
Mechanical 13:
  drawing of 8987 lines, arcs and shapes, not listed
Drill Drawing:
  circle w0.254: c-2.118,116.237 r0.508
  circle w0.254: c-2.118,116.237 r0.847
  lines w0.254: -2.964,108.617 -2.118,107.771 -1.271,108.617 -2.118,109.464 -2.964,108.617 ; -2.964,111.581 -1.271,111.581 -1.271,113.274 -2.964,113.274 -2.964,111.581 ; -2.964,119.201 -2.964,119.624 -2.541,120.047 -2.964,120.471 -2.964,120.894 -2.541,120.894 -2.118,120.471 -1.694,120.894 -1.271,120.894 -1.271,120.471 -1.694,120.047 -1.271,119.624 -1.271,119.201 -1.694,119.201 -2.118,119.624 -2.541,119.201 -2.964,119.201 ; -2.964,123.011 -1.271,123.011 -1.271,124.704 -2.964,124.704 -2.964,123.011 ; -2.964,128.514 -1.271,128.514 -2.118,126.821 -2.964,128.514 ; -2.964,131.054 -2.541,131.054 -2.541,130.631 -1.694,130.631 -1.694,131.054 -1.271,131.054 -1.271,131.901 -1.694,131.901 -1.694,132.324 -2.541,132.324 -2.541,131.901 -2.964,131.901 -2.964,131.054 ; -2.964,136.134 -1.271,136.134 -2.118,134.441 -2.964,136.134 ; -2.964,138.674 -2.541,138.674 -2.118,138.251 -1.694,138.674 -1.271,138.674 -1.694,139.097 -1.271,139.521 -1.694,139.521 -2.118,139.944 -2.541,139.521 -2.964,139.521 -2.541,139.097 -2.964,138.674 ; -2.964,142.061 -2.118,142.484 -1.271,142.061 -1.694,142.907 -1.271,143.754 -2.118,143.331 -2.964,143.754 -2.541,142.907 -2.964,142.061 ; -2.626,123.349 -1.61,123.349 -1.61,124.365 -2.626,124.365 -2.626,123.349 ; -2.626,128.175 -1.61,128.175 -2.118,127.159 -2.626,128.175
  lines w0.381: -4.483,106.628 329.992,106.628 ; -4.483,144.728 329.992,144.728 ; 9.509,102.818 9.509,148.538 ; 24.745,102.818 24.745,148.538 ; 52.677,102.818 52.677,148.538 ; 65.526,102.818 65.526,148.538 ; 84.165,102.818 84.165,148.538 ; 114.382,102.818 114.382,148.538 ; 129.364,102.818 129.364,148.538 ; 148.307,102.818 148.307,148.538 ; 177.255,102.818 177.255,148.538 ; 198.941,102.818 198.941,148.538 ; 232.814,102.818 232.814,148.538 ; 266.688,102.818 266.688,148.538 ; 294.366,102.818 294.366,148.538 ; -4.483,102.818 329.992,102.818 329.992,148.538 -4.483,148.538 -4.483,102.818
  text "Symbol" at -2.197,145.871 h1.83
  text "Count" at 10.652,145.871 h1.83
  text "Hole Size" at 25.888,145.871 h1.83
  text "Plated" at 53.82,145.871 h1.83
  text "Hole Type" at 66.669,145.871 h1.83
  text "Drill Layer Pair" at 85.308,145.871 h1.83
  text "Via/Pad" at 115.525,145.871 h1.83
  text "Pad Shape" at 130.507,145.871 h1.83
  text "Template" at 149.45,145.871 h1.83
  text "Description" at 178.398,145.871 h1.83
  text "Hole Tolerance (+)" at 200.084,145.871 h1.83
  text "Hole Tolerance (-)" at 233.957,145.871 h1.83
  text "Hole Length" at 267.831,145.871 h1.83
  text "Routed Path Length" at 295.509,145.871 h1.83
  text "2" at 10.652,142.061 h1.52
  text "0.600mm (23.62mil)" at 25.888,142.061 h1.52
  text "PTH" at 53.82,142.061 h1.52
  text "Slot" at 66.669,142.061 h1.52
  text "Top - Bottom" at 85.308,142.061 h1.52
  text "Pad" at 115.525,142.061 h1.52
  text "Rounded" at 130.507,142.061 h1.52
  text "r90_170h60_140r100" at 149.45,142.061 h1.52
  text "1.400mm (55.12mil)" at 267.831,142.061 h1.52
  text "0.800mm (31.50mil)" at 295.509,142.061 h1.52
  text "2" at 10.652,138.251 h1.52
  text "0.600mm (23.62mil)" at 25.888,138.251 h1.52
  text "PTH" at 53.82,138.251 h1.52
  text "Slot" at 66.669,138.251 h1.52
  text "Top - Bottom" at 85.308,138.251 h1.52
  text "Pad" at 115.525,138.251 h1.52
  text "Rounded" at 130.507,138.251 h1.52
  text "(Mixed)" at 149.45,138.251 h1.52
  text "1.700mm (66.93mil)" at 267.831,138.251 h1.52
  text "1.100mm (43.31mil)" at 295.509,138.251 h1.52
  text "2" at 10.652,134.441 h1.52
  text "0.620mm (24.41mil)" at 25.888,134.441 h1.52
  text "NPTH" at 53.82,134.441 h1.52
  text "Round" at 66.669,134.441 h1.52
  text "Top - Bottom" at 85.308,134.441 h1.52
  text "Pad" at 115.525,134.441 h1.52
  text "Rounded" at 130.507,134.441 h1.52
  text "c0hn62" at 149.45,134.441 h1.52
  text "-" at 267.831,134.441 h1.52
  text "-" at 295.509,134.441 h1.52
  text "2" at 10.652,130.631 h1.52
  text "0.900mm (35.43mil)" at 25.888,130.631 h1.52
  text "NPTH" at 53.82,130.631 h1.52
  text "Round" at 66.669,130.631 h1.52
  text "Top - Bottom" at 85.308,130.631 h1.52
  text "Pad" at 115.525,130.631 h1.52
  text "Rounded" at 130.507,130.631 h1.52
  text "c0hn90" at 149.45,130.631 h1.52
  text "-" at 267.831,130.631 h1.52
  text "-" at 295.509,130.631 h1.52
  text "4" at 10.652,126.821 h1.52
  text "2.500mm (98.43mil)" at 25.888,126.821 h1.52
  text "NPTH" at 53.82,126.821 h1.52
  text "Round" at 66.669,126.821 h1.52
  text "Top - Bottom" at 85.308,126.821 h1.52
  text "Pad" at 115.525,126.821 h1.52
  text "Rounded" at 130.507,126.821 h1.52
  text "c250hn250" at 149.45,126.821 h1.52
  text "-" at 267.831,126.821 h1.52
  text "-" at 295.509,126.821 h1.52
  text "10" at 10.652,123.011 h1.52
  text "1.600mm (62.99mil)" at 25.888,123.011 h1.52
  text "PTH" at 53.82,123.011 h1.52
  text "Round" at 66.669,123.011 h1.52
  text "Top - Bottom" at 85.308,123.011 h1.52
  text "Pad" at 115.525,123.011 h1.52
  text "(Mixed)" at 130.507,123.011 h1.52
  text "(Mixed)" at 149.45,123.011 h1.52
  text "-" at 267.831,123.011 h1.52
  text "-" at 295.509,123.011 h1.52
  text "16" at 10.652,119.201 h1.52
  text "0.800mm (31.50mil)" at 25.888,119.201 h1.52
  text "PTH" at 53.82,119.201 h1.52
  text "Round" at 66.669,119.201 h1.52
  text "Top - Bottom" at 85.308,119.201 h1.52
  text "Pad" at 115.525,119.201 h1.52
  text "(Mixed)" at 130.507,119.201 h1.52
  text "(Mixed)" at 149.45,119.201 h1.52
  text "-" at 267.831,119.201 h1.52
  text "-" at 295.509,119.201 h1.52
  text "26" at 10.652,115.391 h1.52
  text "0.400mm (15.75mil)" at 25.888,115.391 h1.52
  text "PTH" at 53.82,115.391 h1.52
  text "Round" at 66.669,115.391 h1.52
  text "Top - Bottom" at 85.308,115.391 h1.52
  text "Via" at 115.525,115.391 h1.52
  text "Rounded" at 130.507,115.391 h1.52
  text "v80h40" at 149.45,115.391 h1.52
  text "-" at 267.831,115.391 h1.52
  text "-" at 295.509,115.391 h1.52
  text "70" at 10.652,111.581 h1.52
  text "0.820mm (32.28mil)" at 25.888,111.581 h1.52
  text "PTH" at 53.82,111.581 h1.52
  text "Round" at 66.669,111.581 h1.52
  text "Top - Bottom" at 85.308,111.581 h1.52
  text "Pad" at 115.525,111.581 h1.52
  text "(Mixed)" at 130.507,111.581 h1.52
  text "(Mixed)" at 149.45,111.581 h1.52
  text "-" at 267.831,111.581 h1.52
  text "-" at 295.509,111.581 h1.52
  text "391" at 10.652,107.771 h1.52
  text "0.300mm (11.81mil)" at 25.888,107.771 h1.52
  text "PTH" at 53.82,107.771 h1.52
  text "Round" at 66.669,107.771 h1.52
  text "Top - Bottom" at 85.308,107.771 h1.52
  text "Via" at 115.525,107.771 h1.52
  text "Rounded" at 130.507,107.771 h1.52
  text "v60h30" at 149.45,107.771 h1.52
  text "-" at 267.831,107.771 h1.52
  text "-" at 295.509,107.771 h1.52
  text "525 Total" at 10.652,103.961 h1.52
  text "Slot definitions :" at -2.197,100.278 h1.52
  text "Routed Path Length" at 24.033,100.278 h1.52
  text "= Calculated from tool start centre position to tool end centre position." at 52.041,100.278 h1.52
  text "Hole Length" at 24.033,97.739 h1.52
  text "= Routed Path Length + Tool Size = Slot length as defined in the PCB layout" at 41.63,97.739 h1.52

## Text inside footprints (layer, text, board x,y; h text height)
J1: Top Overlay "Board Edge" at -2.286,44.729 h0.76 r270
J2: Top Overlay "1" at 76.251,71.679 h1.14 r180